# Altium PCB MainBoardPCB_PWR.PcbDoc (part 21 of 29)
Units mm, origin at the board's own origin, x right, y up, seen from the top; angles counter-clockwise.
Board outline 333.63 x 349.38 mm, 16 copper layers (L1, L2 (GND), L3 (Sign), L4 (GND), L5 (Sign), L6 (PWR/GND), L7(PWR/GND), L8 (PWR/GND), L9 (PWR/GND), L10 (PWR/GND), L11 (PWR/GND), L12 (Sign), L13 (GND), L14 (Sign), L15 (GND), L16), stack 2.503 mm thick; 2187 components, 1615 nets, 7987 pads, 1695 vias.
Unrouted connection lines stored in the file: 4757.
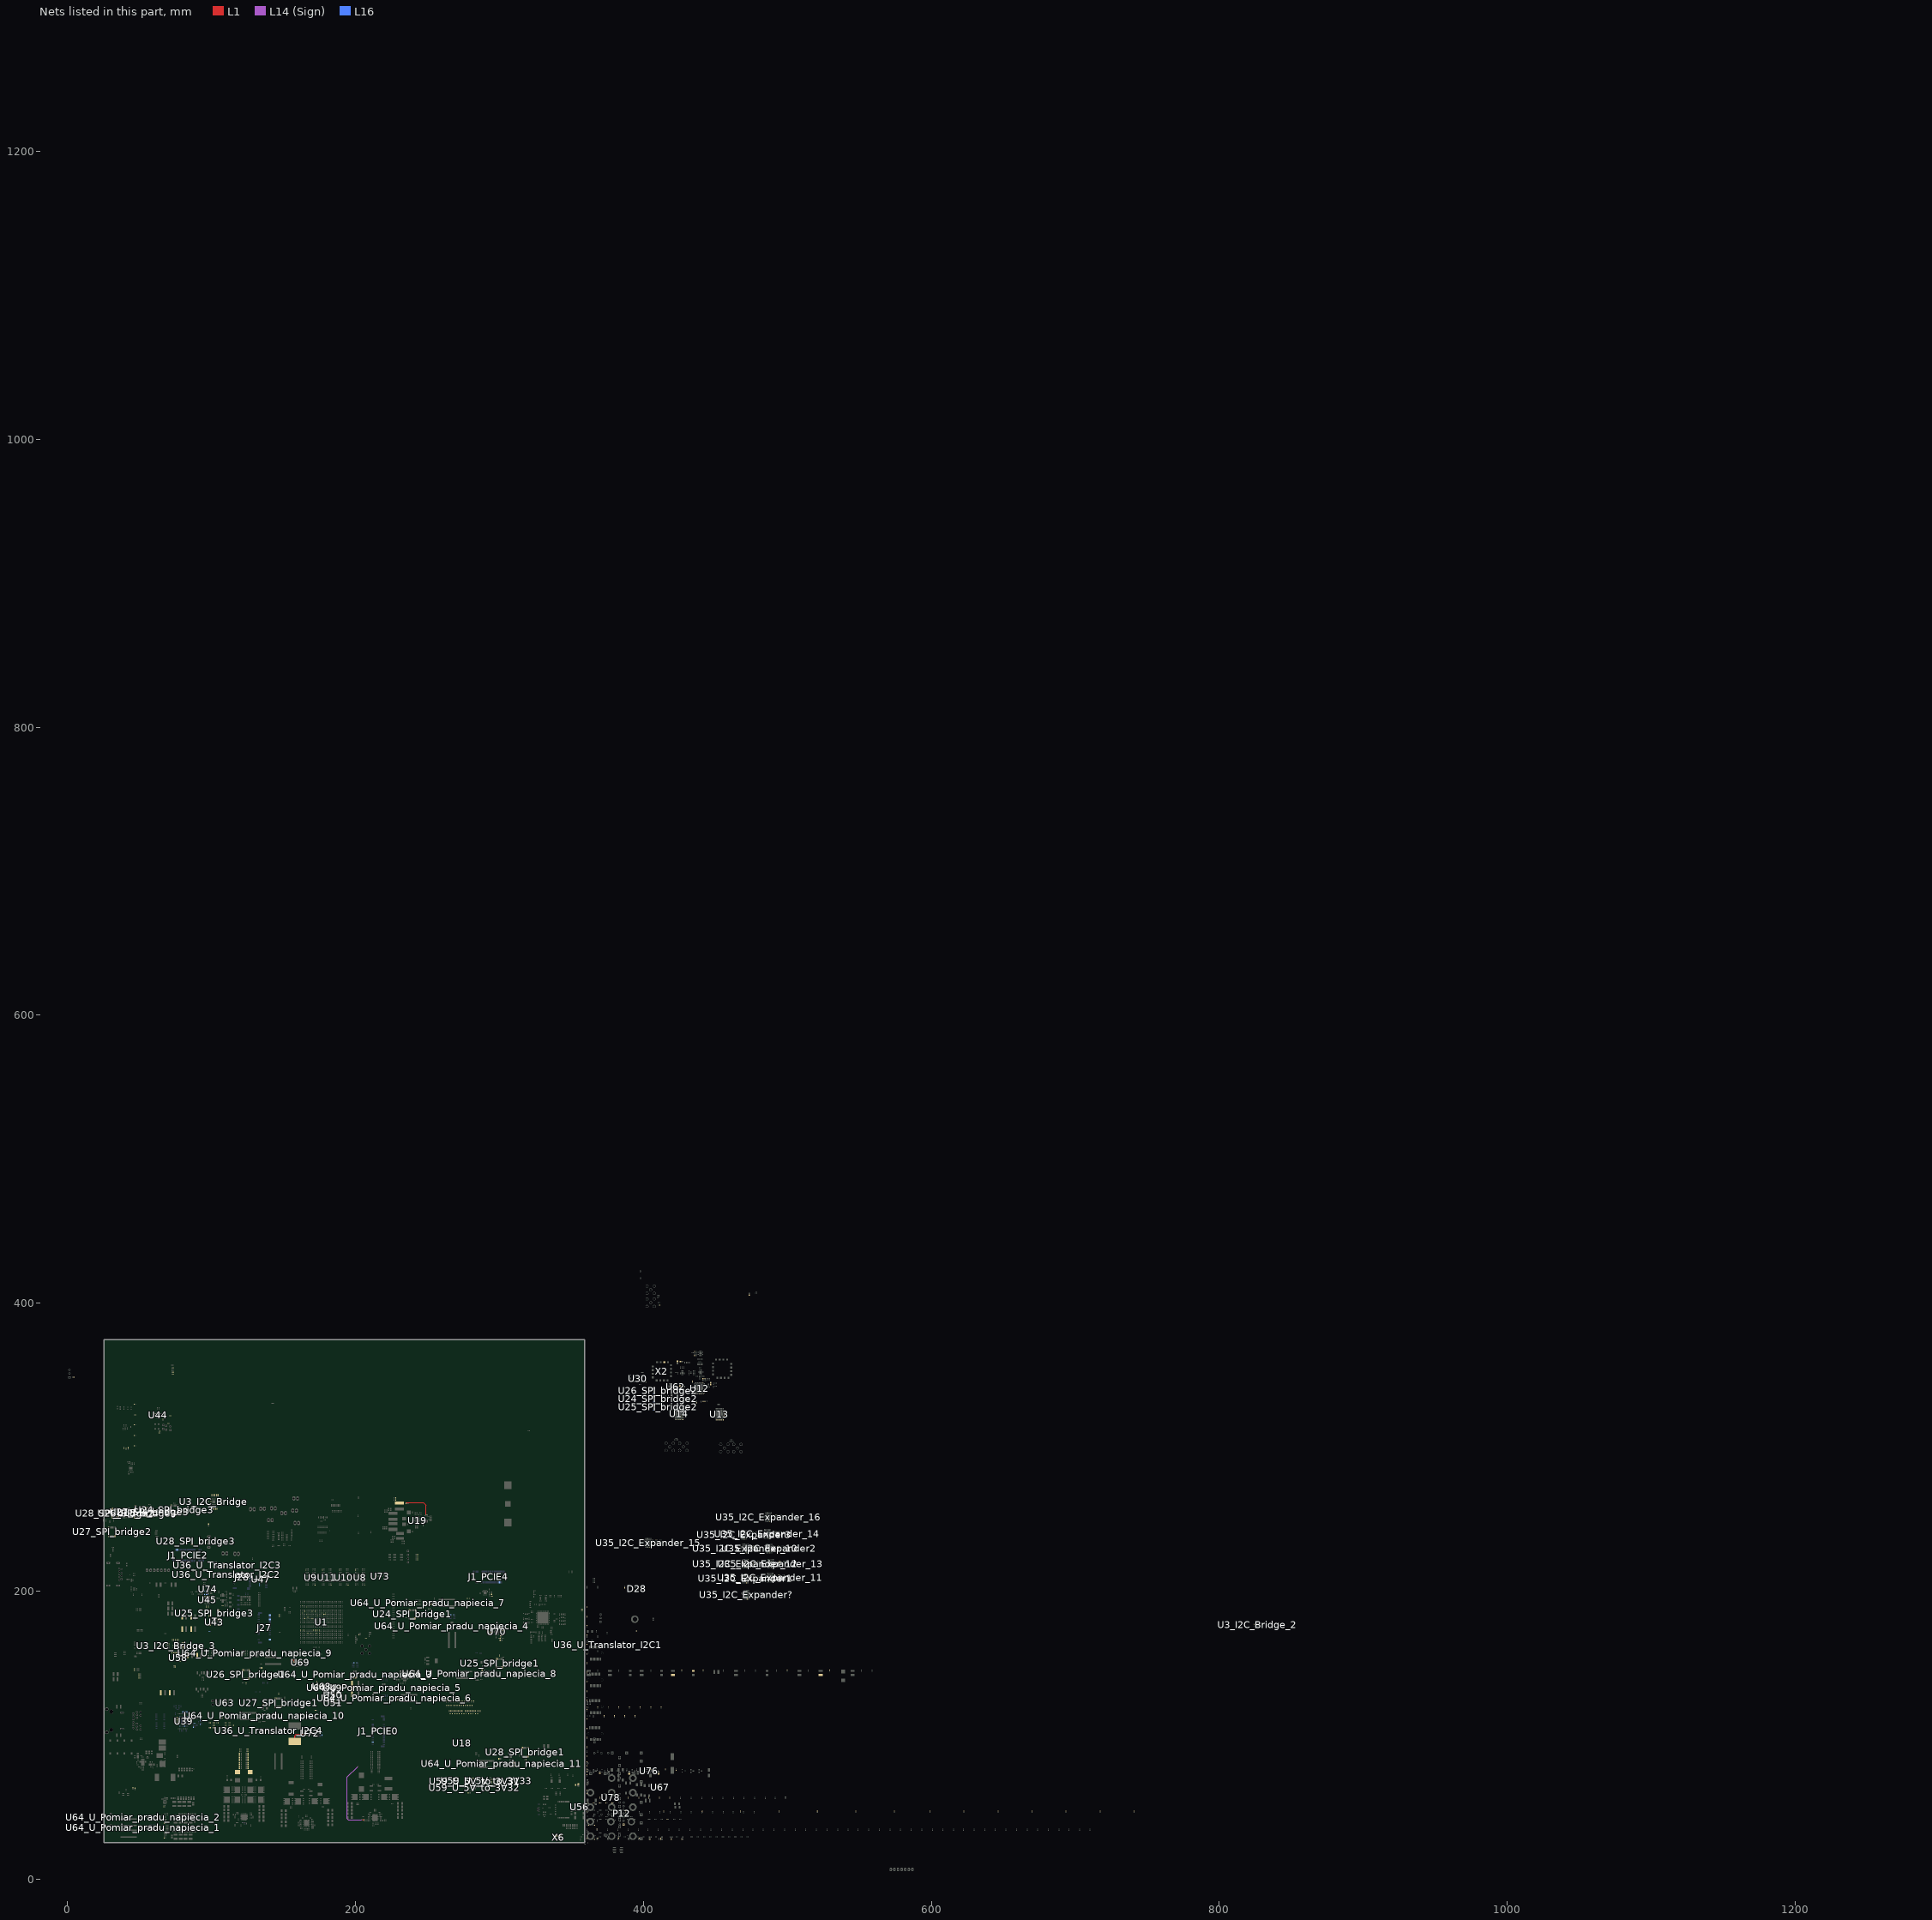
[diagram p16: the nets of this part, all layers, seen from the top]

## Part data (continued)
U74 U76: "IC GATE AND 1CH 2-INP SOT23-5", Case/Package=SOT-23, High Level Output Current=-32mA, Low Level Output Current=32mA, Manufacturer="Texas Instruments", Max Operating Temperature=125°C, Max Supply Voltage=5.5V, Min Operating Temperature=-40°C, Min Supply Voltage=1.65V, Package Quantity=1, Quiescent Current=10uA, Supplier Part Number 1=296-11601-1-ND, ComponentLink1Description=https://datasheet.ciiva.com/27049/756490-27049780.pdf?src-supplier=Jameco, ComponentLink1URL=https://datasheet.ciiva.com/27049/756490-27049780.pdf?src-supplier=Jameco, ComponentLink2Description=https://datasheet.ciiva.com/26048/sn74lvc1g08-26048421.pdf?src-supplier=Avnet+Europe, ComponentLink2URL=https://datasheet.ciiva.com/26048/sn74lvc1g08-26048421.pdf?src-supplier=Avnet+Europe, ComponentLink3Description=https://datasheet.ciiva.com/16503/sn74lvc1g08-16503398.pdf?src-supplier=Avnet+Asia, ComponentLink3URL=https://datasheet.ciiva.com/16503/sn74lvc1g08-16503398.pdf?src-supplier=Avnet+Asia, ComponentLink4Description=https://datasheet.ciiva.com/46439/1834190-46439158.pdf?src-supplier=Element14, ComponentLink4URL=https://datasheet.ciiva.com/46439/1834190-46439158.pdf?src-supplier=Element14, ComponentLink5Description=https://datasheet.ciiva.com/1864/sn74lvc1g08-1864152.pdf?src-supplier=Digi-Key, ComponentLink5URL=https://datasheet.ciiva.com/1864/sn74lvc1g08-1864152.pdf?src-supplier=Digi-Key, ComponentLink6Description=https://datasheet.ciiva.com/28540/1772545-28540795.pdf?src-supplier=Element14, ComponentLink6URL=https://datasheet.ciiva.com/28540/1772545-28540795.pdf?src-supplier=Element14, ComponentLink7Description=https://datasheet.ciiva.com/1864/sn74lvc1g08-1864153.pdf?src-supplier=Digi-Key, ComponentLink7URL=https://datasheet.ciiva.com/1864/sn74lvc1g08-1864153.pdf?src-supplier=Digi-Key, Contact Plating=Gold, Lead Free="Lead Free", Logic Function=AND, Manufacturer Part Number=SN74LVC1G08DBVR, Max Output Current=32mA, Mount="Surface Mount", Number of Bits=1, Number of Circuits=1, Number of Elements=1, Number of Gates=1, Number of Input Lines=2, Number of Inputs=2, Number of Output Lines=1, Number of Outputs=1, Number of Pins=5, Output Current=32mA, Packaging="Tape and Reel", Pricing 1="1 = 0,27000, 10 = 0,22100, 25 = 0,18560, 100 = 0,11740, 250 = 0,09064, 500 = 0,07726, 1000 = 0,05253 (USD)", Propagation Delay=4ns, Radiation Hardening=No, REACH SVHC="No SVHC", RoHS=Yes, Stock 1=64376, Supplier 1=Digi-Key, Termination=SMD/SMT, Turn-On Delay Time=4.5ns, Weight=0.000557oz
U75: "TVS DIODE 26.5VWM 44VC SOT323", Case/Package=SOT-323-3, Clamping Voltage=44V, Manufacturer=STMicroelectronics, Max Operating Temperature=175°C, Min Breakdown Voltage=28.5V, Min Operating Temperature=-55°C, Peak Pulse Current=3A, Peak Pulse Power=250W, Power Line Protection=No, Reverse Standoff Voltage=26.5V, Supplier Part Number 1=497-15845-1-ND, ComponentLink1Description=http://www.mouser.com/ds/2/389/esdcan02-2bwy-954689.pdf?src-supplier=Mouser, ComponentLink1URL=http://www.mouser.com/ds/2/389/esdcan02-2bwy-954689.pdf?src-supplier=Mouser, ComponentLink2Description=https://www.st.com/resource/en/datasheet/esdcan06-2bwy.pdf?src-supplier=Digi-Key, ComponentLink2URL=https://www.st.com/resource/en/datasheet/esdcan06-2bwy.pdf?src-supplier=Digi-Key, ComponentLink3Description=http://www.st.com/content/ccc/resource/sales_and_marketing/promotional_material/selection_guide/fa/8a/bd/fb/a8/06/42/00/sgdiodeauto.pdf/files/sgdiodeauto.pdf/jcr:content/translations/en.sgdiodeauto.pdf?src-supplier=Digi-Key, ComponentLink3URL=http://www.st.com/content/ccc/resource/sales_and_marketing/promotional_material/selection_guide/fa/8a/bd/fb/a8/06/42/00/sgdiodeauto.pdf/files/sgdiodeauto.pdf/jcr:content/translations/en.sgdiodeauto.pdf?src-supplier=Digi-Key, Composition=Zener, Manufacturer Part Number=ESDCAN02-2BWY, Mount="Surface Mount", Number of Bidirectional Channels=2, Packaging="Cut Tape", Pricing 1="1 = 0,43000, 10 = 0,32700, 25 = 0,29440, 100 = 0,15530, 250 = 0,15372, 500 = 0,13764, 1000 = 0,10712 (USD)", RoHS=Yes, Stock 1=3018, Supplier 1=Digi-Key
U77 U78: "Buffer/Driver 2-CH Non-Inverting Open Drain CMOS 6-Pin MicroPak T/R", Low Level Output Current=32mA, Manufacturer="ON Semiconductor / Fairchild", Max Operating Temperature=85°C, Max Supply Voltage=5.5V, Min Operating Temperature=-40°C, Min Supply Voltage=1.65V, Package Quantity=5000, Quiescent Current=1uA, Supplier Part Number 1=NC7WZ07FHXCT-ND, Category="Buffers, Drivers and Transceivers", ComponentLink1Description=http://components.arrow.com/part/dataview/50566895S8849776N7769?src-supplier=Arrow, ComponentLink1URL=http://components.arrow.com/part/dataview/50566895S8849776N7769?src-supplier=Arrow, ComponentLink2Description=http://www.mouser.com/ds/2/149/NC7WZ07-116137.pdf?src-supplier=Mouser, ComponentLink2URL=http://www.mouser.com/ds/2/149/NC7WZ07-116137.pdf?src-supplier=Mouser, ComponentLink3Description=http://uk.rs-online.com/webdocs/12cf/0900766b812cff2b.pdf?src-supplier=RSComponents, ComponentLink3URL=http://uk.rs-online.com/webdocs/12cf/0900766b812cff2b.pdf?src-supplier=RSComponents, ComponentLink4Description=http://components.arrow.com/part/dataview/0323_03242749?src-supplier=Arrow+Europe, ComponentLink4URL=http://components.arrow.com/part/dataview/0323_03242749?src-supplier=Arrow+Europe, ComponentLink5Description=http://www.produktinfo.conrad.com/datenblaetter/1200000-1299999/001253547-da-01-en-IC_BUFFER_UHS_DUA_NC7WZ07FHX_UFDFN_6_FSC.pdf?src-supplier=Conrad, ComponentLink5URL=http://www.produktinfo.conrad.com/datenblaetter/1200000-1299999/001253547-da-01-en-IC_BUFFER_UHS_DUA_NC7WZ07FHX_UFDFN_6_FSC.pdf?src-supplier=Conrad, ComponentLink6Description=https://www.fairchildsemi.com/datasheets/NC/NC7WZ07.pdf?src-supplier=Avnet, ComponentLink6URL=https://www.fairchildsemi.com/datasheets/NC/NC7WZ07.pdf?src-supplier=Avnet, ComponentLink7Description=http://www.fairchildsemi.com/datasheets/NC/NC7WZ07.pdf?src-supplier=Digi-Key, ComponentLink7URL=http://www.fairchildsemi.com/datasheets/NC/NC7WZ07.pdf?src-supplier=Digi-Key, ComponentLink8Description=https://www.fairchildsemi.com/datasheets/NC/NC7WZ07.pdf?src-supplier=Digi-Key, ComponentLink8URL=https://www.fairchildsemi.com/datasheets/NC/NC7WZ07.pdf?src-supplier=Digi-Key, ComponentLink9Description=https://www.onsemi.com/pub/Collateral/NC7WZ07-D.pdf?src-supplier=Digi-Key, ComponentLink9URL=https://www.onsemi.com/pub/Collateral/NC7WZ07-D.pdf?src-supplier=Digi-Key, Height=0.55mm, Length=1mm, Logic Function=Buffer,Inverting, Manufacturer Part Number=NC7WZ07FHX, Mount="Surface Mount", Number of Bits per Element=1, Number of Channels=2, Number of Elements=2, Number of Input Lines=2, Number of Inputs=2, Number of Output Lines=2, Number of Outputs=2, Number of Pins=6, Packaging="Tape and Reel", Polarity=Non-Inverting, Pricing 1="1=0,62000, 10=0,53300, 100=0,39800, 500=0,31270, 1000=0,24164 (USD)", Propagation Delay=12.6ns, RoHS=Yes, Schmitt Trigger Input=No, Stock 1=3074, Supplier 1=Digi-Key, Turn-On Delay Time=12.6ns, Weight=0.02g, Width=1mm
X1: library part CVCO55CC-2000-2000, Frequency=2GHz, Load Capacitance=22pF, Manufacturer=Crystek, Max Operating Temperature=85°C, Min Operating Temperature=-30°C, Operating Supply Voltage=8V, Package Quantity=1, Supplier Part Number 1=549-CVCO55CC20002000, ComponentLink1Description=https://datasheet.ciiva.com/12380/cvco55cc-2000-2000-218619-12380053.pdf?src-supplier=Mouser, ComponentLink1URL=https://datasheet.ciiva.com/12380/cvco55cc-2000-2000-218619-12380053.pdf?src-supplier=Mouser, ComponentLink2Description=https://datasheet.ciiva.com/6719/cvco55cc-2000-2000-6719815.pdf?src-supplier=Digi-Key, ComponentLink2URL=https://datasheet.ciiva.com/6719/cvco55cc-2000-2000-6719815.pdf?src-supplier=Digi-Key, Height=0.22inch, Length=0.5inch, Manufacturer Part Number=CVCO55CC-2000-2000, Packaging="Cut Tape", Pricing 1="1 = 32,65000, 5 = 31,16000, 10 = 28,20000, 25 = 26,71000, 50 = 25,23000, 100 = 22,26000 (USD)", RoHS=Yes, Stock 1=18, Supplier 1=Mouser, Termination=SMD/SMT, Width=0.5inch
X2: library part CVCO55CL-0490-0540, Case/Package=SMD/SMT, Frequency=540MHz, Load Capacitance=100pF, Manufacturer=Crystek, Max Operating Temperature=85°C, Max Supply Voltage=5.25V, Min Operating Temperature=-40°C, Min Supply Voltage=4.75V, Package Quantity=5, Supplier Part Number 1=744-1174-ND, ComponentLink1Description=https://datasheet.ciiva.com/884/cvco55cl-0490-0540-884171.pdf?src-supplier=Digi-Key, ComponentLink1URL=https://datasheet.ciiva.com/884/cvco55cl-0490-0540-884171.pdf?src-supplier=Digi-Key, ComponentLink2Description=https://datasheet.ciiva.com/12381/cvco55cl-0490-0540-32994-12381581.pdf?src-supplier=Mouser, ComponentLink2URL=https://datasheet.ciiva.com/12381/cvco55cl-0490-0540-32994-12381581.pdf?src-supplier=Mouser, ComponentLink3Description=https://datasheet.ciiva.com/14620/70051761-14620845.pdf?src-supplier=Allied+Electronics, ComponentLink3URL=https://datasheet.ciiva.com/14620/70051761-14620845.pdf?src-supplier=Allied+Electronics, Height=0.15inch, Length=0.5inch, Manufacturer Part Number=CVCO55CL-0490-0540, Mount="Surface Mount", Number of Pins=16, Packaging="Cut Tape", Pricing 1="1 = 24,31000, 5 = 23,20600, 10 = 20,99500, 25 = 19,89000, 50 = 18,78500 (USD)", RoHS=Yes, Stock 1=6, Supplier 1=Digi-Key, Termination=SMD/SMT, Width=0.5inch
X3: library part MP024S, "CRYSTAL 2.4576MHZ 32PF T/H", ESR (Equivalent Series Resistance)=300R, Frequency Stability=50ppm, Frequency Tolerance=30ppm, Load Capacitance=32pF, Manufacturer=CTS, Max Operating Temperature=70°C, Min Operating Temperature=-20°C, Package Quantity=100, Supplier Part Number 1=CTX069-ND, ComponentLink1Description=https://datasheet.ciiva.com/27056/2039161-27056418.pdf?src-supplier=Jameco, ComponentLink1URL=https://datasheet.ciiva.com/27056/2039161-27056418.pdf?src-supplier=Jameco, ComponentLink2Description=https://datasheet.ciiva.com/15116/getdatasheetpartid-123295-15116382.pdf?src-supplier=Verical, ComponentLink2URL=https://datasheet.ciiva.com/15116/getdatasheetpartid-123295-15116382.pdf?src-supplier=Verical, ComponentLink3Description=https://datasheet.ciiva.com/854/008-0308-0-854108.pdf?src-supplier=Digi-Key, ComponentLink3URL=https://datasheet.ciiva.com/854/008-0308-0-854108.pdf?src-supplier=Digi-Key, Depth=3.8mm, Frequency=2.4576MHz, Height=0.53inch, Lead Free="Lead Free", Length=10.85mm, Manufacturer Part Number=MP024S, Mount="Through Hole", Number of Pins=2, Packaging=Bulk, Pricing 1="1 = 1,14000, 10 = 1,08500, 50 = 1,05980, 100 = 0,90850, 500 = 0,88322, 1000 = 0,74443, 2500 = 0,70658, 5000 = 0,68135, 10000 = 0,65611 (USD)", Radiation Hardening=No, RoHS=Yes, Series Resistance=300R, Stock 1=2166, Supplier 1=Digi-Key, Termination=Radial, Tolerance=30ppm, Width=0.15inch
X4: "CRYSTAL 25.0000MHZ 18PF SMD", Case/Package=SMD/SMT, ESR (Equivalent Series Resistance)=50R, Frequency=25MHz, Frequency Stability=30ppm, Frequency Tolerance=50ppm, Load Capacitance=18pF, Manufacturer 1=Epson, Max Operating Temperature=70°C, Min Operating Temperature=-20°C, Package Quantity=250, Supplier Part Number 1=SER3691CT-ND, ComponentLink1Description=http://www.mouser.com/ds/2/137/A-238_en-932914.pdf?src-supplier=Mouser, ComponentLink1URL=http://www.mouser.com/ds/2/137/A-238_en-932914.pdf?src-supplier=Mouser, ComponentLink2Description=https://www5.epsondevice.com/en/information/support/pdf/june_2018_psc_masterbook.pdf?src-supplier=Digi-Key, ComponentLink2URL=https://www5.epsondevice.com/en/information/support/pdf/june_2018_psc_masterbook.pdf?src-supplier=Digi-Key, Height=0.028inch, Lead Free="Lead Free", Length=0.126inch, Manufacturer Part Number 1=FA-23825.0000MB-C3, Mount="Surface Mount", Packaging="Tape and Reel", Pricing 1="1=0,36000, 10=0,30300, 50=0,27220, 100=0,24200 (USD)", RoHS=Yes, Stock 1=39779, Supplier 1=Digi-Key, Termination=SMD/SMT, Tolerance=50ppm, Weight=0.000564oz, Width=0.098inch
X5: library part FC-13532.7680KA-A5, "CRYSTAL 32.7680 KHZ 12.5PF SMD", Case/Package=SMD/SMT, ESR (Equivalent Series Resistance)=70kR, Frequency Tolerance=20ppm, Load Capacitance=12.5pF, Manufacturer=Epson, Max Operating Temperature=85°C, Min Operating Temperature=-40°C, Supplier Part Number 1=SER4103CT-ND, Category=Crystals, ComponentLink1Description=https://support.epson.biz/td/api/doc_check.php?dl=brief_FC-135&lang=en&src-supplier=Digi-Key, ComponentLink1URL=https://support.epson.biz/td/api/doc_check.php?dl=brief_FC-135&lang=en&src-supplier=Digi-Key, ComponentLink2Description=https://www.eea.epson.com/wp-content/uploads/2016/11/November-2016-PCS-MASTER-BOOK.pdf?src-supplier=Digi-Key, ComponentLink2URL=https://www.eea.epson.com/wp-content/uploads/2016/11/November-2016-PCS-MASTER-BOOK.pdf?src-supplier=Digi-Key, Frequency=32.768kHz, Height=0.035inch, Length=0.126inch, Manufacturer Part Number=FC-13532.7680KA-A5, Mount="Surface Mount", Number of Pins=2, Packaging="Tape and Reel", Pricing 1="1=0,43000, 10=0,35800, 50=0,32180, 100=0,28600, 500=0,27170, 1000=0,22880 (USD)", RoHS=Yes, Series Resistance=70kR, Stock 1=101729, Supplier 1=Digi-Key, Width=0.061inch
X6: "SMD Crystal Oscillator 50MHz 3.3V 4-Pin SMD Tray", Case/Package=SMD/SMT, Frequency=50MHz, Frequency Stability=20ppm, Manufacturer="Silicon Labs", Operating Supply Voltage=3.3V, Package Quantity=1, Supplier Part Number 1=336-5245-ND, ComponentLink1Description=https://datasheet.ciiva.com/9292/+si510-11-9292588.pdf?src-supplier=Avnet, ComponentLink1URL=https://datasheet.ciiva.com/9292/+si510-11-9292588.pdf?src-supplier=Avnet, Length=5mm, Manufacturer Part Number=510CCA50M0000BAG, Packaging=Tray, Pricing 1="1 = 3,26000, 25 = 3,13800, 100 = 3,01710, 1000 = 2,62163 (USD)", RoHS=Yes, Stock 1=247, Supplier 1=Digi-Key, Weight=0.001764oz, Width=3.2mm
X7: "CRYSTAL 24.00 MHZ 9.0PF SMD", Case/Package=SMD/SMT, ESR (Equivalent Series Resistance)=40R, Frequency=24MHz, Frequency Stability=15ppm, Frequency Tolerance=10ppm, Load Capacitance=9pF, Manufacturer 1=Epson, Max Operating Temperature=85°C, Min Operating Temperature=-40°C, Supplier Part Number 1=SER4180DKR-ND, ComponentLink1Description=https://www5.epsondevice.com/en/information/support/pdf/june_2018_psc_masterbook.pdf?src-supplier=Digi-Key, ComponentLink1URL=https://www5.epsondevice.com/en/information/support/pdf/june_2018_psc_masterbook.pdf?src-supplier=Digi-Key, Height=0.024inch, Lead Free="Lead Free", Length=0.126inch, Manufacturer Part Number 1=TSX-322524.0000MF15X-AC6, Mount="Surface Mount", Packaging="Tape and Reel", Pricing 1="1=0,36000, 10=0,30300, 50=0,27220, 100=0,24200, 500=0,22990, 1000=0,19360 (USD)", RoHS=Yes, Stock 1=33708, Supplier 1=Digi-Key, Width=0.098inch
X8: Manufacturer 1="ECS International", Supplier Part Number 1=XC2904CT-ND, Manufacturer Part Number 1=ECS-120-8-33-RWY-TR, Pricing 1="1=0,56000, 10=0,46500, 50=0,41820, 100=0,37180, 500=0,35322 (USD)", RoHS=No, Stock 1=526, Supplier 1=Digi-Key
X9: "OSC MEMS 48.0000MHZ LVCMOS SMD", Case/Package=SMD/SMT, Frequency=48MHz, Frequency Stability=25ppm, Manufacturer=SiTime, Max Operating Temperature=85°C, Max Supply Current=4.5mA, Min Operating Temperature=-40°C, Supplier Part Number 1=1473-30890-1-ND, Category=Oscillators, ComponentLink1Description=https://www.sitime.com/products/datasheets/sit1602/SiT1602B-datasheet.pdf?src-supplier=Digi-Key, ComponentLink1URL=https://www.sitime.com/products/datasheets/sit1602/SiT1602B-datasheet.pdf?src-supplier=Digi-Key, Height=0.032inch, Length=0.098inch, Manufacturer Part Number=SIT1602BI-12-33E-48.000000G, Mount="Surface Mount", Packaging="Tape and Reel", Pricing 1="1=1,36000, 10=1,30100, 50=1,27060, 100=1,08900 (USD)", RoHS=Yes, Stock 1=283, Supplier 1=Digi-Key, Width=0.079inch
P7 P8 P9 P10: LatestRevisionDate=17-Jul-2002, LatestRevisionNote="Re-released for DXP Platform.", Publisher="Altium Limited"

## Via types
v1: diameter 0.5, hole 0.2, L1 to L16, 786 vias
v2: diameter 0.5/0.35/0.35/0.35/0.35/0.35/0.35/0.35/0.35/0.35/0.35/0.35/0.35/0.35/0.35/0.5 (per signal layer), hole 0.15, L1 to L16, tented both sides, 164 vias
v3: diameter 2.54, hole 1.02, L1 to L16, 152 vias
v4: diameter 0.5/0.35/0.35/0.35/0.35/0.35/0.35/0.35/0.35/0.35/0.35/0.35/0.35/0.35/0.35/0.5 (per signal layer), hole 0.2, L1 to L16, tented both sides, 100 vias
v5: diameter 0.45, hole 0.15, L1 to L16, 79 vias
v6: diameter 0.35/0/0.35 (per signal layer), hole 0.127, L1 to L3 (Sign), tented both sides, 78 vias
v7: diameter 0.45/0.45/0.45/0.45/0.45/0.45/0.45/0.45/0.45/0.45/0.45/0.45/0.45/0.45/0.45/0.45 (per signal layer), hole 0.15, L1 to L16, 65 vias
v8: diameter 0.4, hole 0.15, L1 to L16, 61 vias
v9: diameter 0.2, hole 0.1, L1 to L16, 35 vias
v10: diameter 0.5, hole 0.2, L1 to L16, tented both sides, 32 vias
v11: diameter 0.2/0/0.2 (per signal layer), hole 0.1, L1 to L3 (Sign), 28 vias
v12: diameter 0.4, hole 0.2, L1 to L16, 16 vias
v13: diameter 0.25, hole 0.2, L1 to L16, 16 vias
v14: diameter 0.3, hole 0.2, L1 to L16, 15 vias
v15: diameter 0.5/0.35/0.35/0.35/0.35/0.35/0.35/0.35/0.35/0.35/0.35/0.35/0.35/0.35/0.35/0.45 (per signal layer), hole 0.15, L1 to L16, tented both sides, 10 vias
v16: diameter 5, hole 3, L1 to L16, 9 vias
v17: diameter 0.2/0/0.2 (per signal layer), hole 0.1, L1 to L3 (Sign), tented both sides, 9 vias
v18: diameter 0.35/0/0.35 (per signal layer), hole 0.127, L1 to L3 (Sign), 7 vias
v19: diameter 0.35/0/0.35 (per signal layer), hole 0.127, L14 (Sign) to L16, tented both sides, 5 vias
v20: diameter 1.65, hole 1.65, L1 to L16, 4 vias
v21: diameter 1.15, hole 1.15, L1 to L16, 4 vias
v22: diameter 0.35, hole 0.127, L1 to L2 (GND), 2 vias
v23: diameter 0.4, hole 0.2, L1 to L16, tented both sides, 2 vias
v24: diameter 0.35, hole 0.127, L1 to L2 (GND), tented both sides, 2 vias
v25: diameter 0.508, hole 0.127, L1 to L2 (GND), 2 vias
v26: diameter 0.508, hole 0.127, L2 (GND) to L3 (Sign), 2 vias
v27: diameter 0.35, hole 0.127, L3 (Sign) to L6 (PWR/GND), tented both sides, 2 vias
v28: diameter 0.5, hole 0.2, L3 (Sign) to L6 (PWR/GND), tented both sides, 2 vias
v29: diameter 5.5, hole 3.5, L1 to L16, 1 vias
v30: diameter 0.45/0.45/0.45 (per signal layer), hole 0.15, L1 to L3 (Sign), 1 vias
v31: diameter 0.35/0.35/0.35 (per signal layer), hole 0.127, L1 to L3 (Sign), tented both sides, 1 vias
v32: diameter 0.45/0/0.45 (per signal layer), hole 0.15, L1 to L3 (Sign), tented both sides, 1 vias
v33: diameter 0.45/0/0.45 (per signal layer), hole 0.2, L14 (Sign) to L16, tented both sides, 1 vias
v34: diameter 0.35, hole 0.127, L2 (GND) to L3 (Sign), 1 vias

## Nets (pads, with @x,y where several pads share a name; then routed paths per layer and width w, separated by ;. In a path a pad name is that pad's centre, name@x,y a point inside that pad or via, vN(x,y) a via of type N, cw(c..) or ccw(c..) an arc to the next point about the centre after c; other vN are vias at no path point)
0.85V@40A_INA: C359.2 C360.2 C361.2 C362.2 C363.2 C364.2 C365.2 C366.2 C367.2 C368.2 C369.2 C370.2 C377.2 C378.2 C379.2 C380.2 C381.2 C382.2 C383.2 C384.2 C385.2 C386.2 C387.2 C388.2 L9.2 L10.2 R617.1 U72.10 | length 10.4
  L1 w0.164: 161.582,100.408 161.902,100.728 163.858,100.728
  L1 w0.912: R617.1@157.952,95.58 157.952,99.541 158.819,100.408 161.582,100.408
0V9@1A_REG3: C709.2 C710.2 R673.2 U1.A10 U1.C10 U1.F8 U1.H8 U1.M8 U1.P8 U70.11 U70.12
0V85@2A: C675.2 C746.2 FB45.2 U1.J23 U1.L23 | length 2.3
  L1 w0.254: 156.588,152.162 156.608,152.142 157.567,152.142 C675.2@157.587,152.122 FB45.2@157.587,150.837
1V0@1.5A: C505.2 C506.2 C507.2 C508.2 C509.2 C510.2 C511.2 C512.2 C513.2 C514.2 C555.2 R397.2 U39.6 U39.24 U39.31 U39.42 U51.8
1V8@0.5A_ADC_filtered: C705.2 C706.2 C749.2 C750.2 C757.1 C758.2 D28.3 FB38.1 FB40.1 FB42.1 R671.2 R694.1 R745.2 U1.K10 U1.L10 U1.M10 U1.N10 U1.P10 U1.T22 U1.U21 U1.V21 U1.V22 U70.14 U70.15
1V8@1.5A: C485.2 C486.2 C487.2 C488.2 C489.2 C490.2 C553.2 C561.2 C729.2 C730.2 R394.2 U39.13 U39.48 U45.28 U45.30 U50.8 U58.8
2V5@1.5A: C499.2 C500.2 C501.2 C502.2 C503.2 C504.2 C551.2 C782.2 C783.2 C784.2 C785.2 C786.2 C787.2 C788.2 C789.2 R391.2 R392.2 U8.B1 U8.R6 U9.B1 U9.R6 U10.B1 U10.R6 U11.B1 U11.R6 U39.3 U39.9 U49.8
3.3V_LN_1: C55.2 C56.2 C59.2 C60.2 C65.2 C66.2 C71.2 C72.2 C84.2 C85.2 C94.2 C95.2 C569.2 FB2.1 FB3.1 FB4.1 FB5.1 FB6.1 FB7.1 FB33.2 | length 0.1
  L1 w0.254: C569.2@294.834,196.4 C569.2@294.875,196.36
3.3V_PS_Config: C491.2 C492.2 C493.2 C494.2 C495.2 C496.2 C497.2 C498.2 C531.1 C547.2 C612.2 C613.2 C614.2 C615.2 C742.1 C743.2 C790.2 L17.2 R83.2 R84.2 R85.2 R86.2 R97.2 R98.2 R99.2 R106.1 R123.2 R216.1 R319.2 R320.2 R322.2 R323.2 R333.1 R336.1 R337.1 R338.1 R346.1 R347.1 R348.1 R349.2 R350.2 R351.2 R352.2 R353.1 R354.2 R355.1 R356.1 R357.2 R367.2 R368.2 R369.2 R370.2 R371.2 R372.2 R381.2 R382.2 R709.1 R710.2 R715.2 R716.2 R717.2 R718.2 R719.2 R737.2 U1.B22 U1.B27 U1.D18 U1.D23 U1.D28 U1.E21 U1.E26 U1.F19 U1.J18 U1.N20 U1.P18 U39.19 U39.30 U39.41 U43.1 U43.2 U43.7 U43.8 U43.15 U43.16 U44.1 U47.B3 U47.C4 U56.15 U68.3 U76.5 X6.1 X6.4 | length 21.9
  L1 w0.254: C614.2@235.147,260.761 235.42,261.034 235.42,261.439 235.57,261.588 247.122,261.588 249.13,259.58 R216.1@249.13,253.074
3.3V_Stable_1: C149.2 C150.2 C151.2 C152.2 C153.2 C154.2 C155.2 C156.2 C157.2 C158.2 C159.2 C160.2 C161.2 C181.2 C182.2 C183.2 C184.2 C185.2 C186.2 C187.2 C188.2 C189.2 C190.2 C191.2 C192.2 C193.2 C565_U_5V_to_3V33.2 C566_U_5V_to_3V33.2 C567_U_5V_to_3V33.2 R430_U_5V_to_3V33.2 R431_U_5V_to_3V33.2 U12.2 U12.5 U12.8 U12.11 U12.14 U12.17 U12.20 U12.23 U12.26 U12.29 U12.32 U12.35 U59_U_5V_to_3V33.8
3.3V_Stable_2: C166.2 C167.2 C168.2 C169.2 C170.2 C171.2 C172.2 C173.2 C174.2 C175.2 C176.2 C177.2 C178.2 C194.2 C195.2 C196.2 C197.2 C198.2 C199.2 C200.2 C201.2 C202.2 C203.2 C204.2 C205.2 C206.2 C565_U_5V_to_3V32.2 C566_U_5V_to_3V32.2 C567_U_5V_to_3V32.2 R430_U_5V_to_3V32.2 R431_U_5V_to_3V32.2 U13.2 U13.5 U13.8 U13.11 U13.14 U13.17 U13.20 U13.23 U13.26 U13.29 U13.32 U13.35 U59_U_5V_to_3V32.8
3.3V_Stable_3: C111.2 C112.2 C113.2 C114.2 C115.2 C116.2 C117.2 C118.2 C119.2 C120.2 C121.2 C122.2 C123.2 C128.2 C129.2 C130.2 C131.2 C132.2 C133.2 C134.2 C135.2 C136.2 C137.2 C138.2 C139.2 C140.2 C565_U_5V_to_3V31.2 C566_U_5V_to_3V31.2 C567_U_5V_to_3V31.2 R430_U_5V_to_3V31.2 R431_U_5V_to_3V31.2 U14.2 U14.5 U14.8 U14.11 U14.14 U14.17 U14.20 U14.23 U14.26 U14.29 U14.32 U14.35 U59_U_5V_to_3V31.8
3.3Vaux: C332.2 J27.2 J27.4 J27.12 J27.14 J27.16 J27.18 J27.62 J27.64 J27.66 U18.C2 U18.D1 U18.D2 U18.E1 U18.E2 U18.F1 U18.F2
3V3_Rail: C303_I2C_Bridge.2 C303_I2C_Bridge_2.2 C303_I2C_Bridge_3.2 C309_U_Pomiar_pradu_napiecia_1.2 C309_U_Pomiar_pradu_napiecia_2.2 C309_U_Pomiar_pradu_napiecia_3.2 C309_U_Pomiar_pradu_napiecia_4.2 C309_U_Pomiar_pradu_napiecia_5.2 C309_U_Pomiar_pradu_napiecia_6.2 C309_U_Pomiar_pradu_napiecia_7.2 C309_U_Pomiar_pradu_napiecia_8.2 C309_U_Pomiar_pradu_napiecia_9.2 C309_U_Pomiar_pradu_napiecia_10.2 C309_U_Pomiar_pradu_napiecia_11.2 C310.2 C311_I2C_Expander1.2 C311_I2C_Expander2.2 C311_I2C_Expander3.2 C311_I2C_Expander?.2 C311_I2C_Expander_10.2 C311_I2C_Expander_11.2 C311_I2C_Expander_12.2 C311_I2C_Expander_13.2 C311_I2C_Expander_14.2 C311_I2C_Expander_15.2 C311_I2C_Expander_16.2 C324.2 C331.2 C339.2 C545.2 C546.2 C550.2 C552.2 C554.2 C562.2 C585.2 C623.2 C654.2 C676.2 C707.2 C708.2 C721.2 C732.2 C735.2 C792.2 FB1_PCIE0.2 FB1_PCIE1.2 FB1_PCIE2.2 FB1_PCIE3.2 FB1_PCIE4.2 FB23.1 FB24.1 J1_PCIE0.6 J1_PCIE0.8 J1_PCIE0.10 J1_PCIE2.6 J1_PCIE2.8 J1_PCIE2.10 J1_PCIE4.6 J1_PCIE4.8 J1_PCIE4.10 J28.4 L1.1 L2.1 L3.1 L4.1 L5.1 L6.1 L7.1 L8.1 P12.1 R3_I2C_Bridge.2 R3_I2C_Bridge_2.2 R3_I2C_Bridge_3.2 R4_I2C_Bridge.2 R4_I2C_Bridge_2.2 R4_I2C_Bridge_3.2 R5_I2C_Bridge.2 R5_I2C_Bridge_2.2 R5_I2C_Bridge_3.2 R6_I2C_Bridge.2 R6_I2C_Bridge_2.2 R6_I2C_Bridge_3.2 R7_I2C_Bridge.2 R7_I2C_Bridge_2.2 R7_I2C_Bridge_3.2 R8_I2C_Bridge.2 R8_I2C_Bridge_2.2 R8_I2C_Bridge_3.2 R9_I2C_Bridge.2 R9_I2C_Bridge_2.2 R9_I2C_Bridge_3.2 R10_I2C_Bridge.2 R10_I2C_Bridge_2.2 R10_I2C_Bridge_3.2 R11.1 R13.1 R16.1 R29.2 R30.2 R65.2 R66.2 R67.2 R68.2 R71.2 R72.2 R124.2 R175.1 R179.1 R184.1 R188.1 R193.1 R197.1 R202.1 R206.1 R211.1 R219.1 R223_I2C_Bridge.2 R223_I2C_Bridge_2.2 R223_I2C_Bridge_3.2 R224_I2C_Bridge.2 R224_I2C_Bridge_2.2 R224_I2C_Bridge_3.2 R225_I2C_Bridge.2 R225_I2C_Bridge_2.2 R225_I2C_Bridge_3.2 R226_I2C_Bridge.2 R226_I2C_Bridge_2.2 R226_I2C_Bridge_3.2 R227_I2C_Bridge.2 R227_I2C_Bridge_2.2 R227_I2C_Bridge_3.2 R230.1 R231_SPI_bridge1.2 R231_SPI_bridge2.2 R233_SPI_bridge1.2 R233_SPI_bridge2.2 R233_SPI_bridge3.2 R236_SPI_bridge1.2 R236_SPI_bridge2.2 R236_SPI_bridge3.2 R238_SPI_bridge1.2 R240_SPI_bridge1.2 R240_SPI_bridge2.2 R241.2 R243.2 R252.2 R253.2 R281.2 R287.2 R376.2 R377.2 R378.2 R388.1 R425.2 R426.2 R427.2 R428.2 R429.2 R448_U_Pomiar_pradu_napiecia_3.2 R449.2 R451.2 R453.2 R455.2 R458.2 R462.2 R463.1 R468.1 R469.2 R471.2 R473.2 R475.2 R477.2 R479.2 R492.2 R494.2 R496.2 R500.2 R502.2 R504.2 R508.2 R510.2 R512.2 R516.2 R518.2 R520.2 R524.2 R526.2 R528.2 R538.2 R558_I2C_Bridge.2 R558_I2C_Bridge_2.2 R558_I2C_Bridge_3.2 R559_I2C_Bridge.2 R559_I2C_Bridge_2.2 R559_I2C_Bridge_3.2 R560_I2C_Bridge.2 R560_I2C_Bridge_2.2 R560_I2C_Bridge_3.2 R562.1 R566.1 R570.1 R574.1 R578.1 R582.1 R586.1 R590.1 R596.1 R599.2 R600.2 R602.1 R603.1 R604.1 R605.1 R606.1 R630.1 R632.2 R633.2 R634.2 R646.1 R649.1 R676.2 R691.1 R697.2 R699.2 R701.2 R703.2 R705.2 R707.2 R730.2 R731.2 R732.2 R733.2 R734.2 R738.2 R740.2 R742.2 R746.2 R747.2 R748.2 R749.2 R750.2 R751.2 R752.2 R753.2 R754.2 R755.2 R756.2 R757.2 R758.2 R760.2 R762.2 R832.1 R833.1 R834.1 R835.1 U3_I2C_Bridge.21 U3_I2C_Bridge_2.21 U3_I2C_Bridge_3.21 U15.15 U18.C3 U18.D3 U18.D4 U18.E3 U18.E4 U18.F3 U18.F4 U19.13 U19.16 U24_SPI_bridge1.1 U24_SPI_bridge1.7 U24_SPI_bridge1.8 U24_SPI_bridge1.15 U24_SPI_bridge1.16 U24_SPI_bridge2.1 U24_SPI_bridge2.7 U24_SPI_bridge2.8 U24_SPI_bridge2.15 U24_SPI_bridge2.16 U24_SPI_bridge3.1 U24_SPI_bridge3.7 U24_SPI_bridge3.8 U24_SPI_bridge3.16 U25_SPI_bridge1.1 U25_SPI_bridge1.7 U25_SPI_bridge1.8 U25_SPI_bridge1.15 U25_SPI_bridge1.16 U25_SPI_bridge2.1 U25_SPI_bridge2.7 U25_SPI_bridge2.8 U25_SPI_bridge2.15 U25_SPI_bridge2.16 U25_SPI_bridge3.1 U25_SPI_bridge3.7 U25_SPI_bridge3.8 U25_SPI_bridge3.15 U25_SPI_bridge3.16 U26_SPI_bridge1.1 U26_SPI_bridge1.7 U26_SPI_bridge1.8 U26_SPI_bridge1.15 U26_SPI_bridge1.16 U26_SPI_bridge2.1 U26_SPI_bridge2.7 U26_SPI_bridge2.8 U26_SPI_bridge2.15 U26_SPI_bridge2.16 U26_SPI_bridge3.1 U26_SPI_bridge3.7 U26_SPI_bridge3.8 U26_SPI_bridge3.15 U26_SPI_bridge3.16 U27_SPI_bridge1.1 U27_SPI_bridge1.7 U27_SPI_bridge1.8 U27_SPI_bridge1.15 U27_SPI_bridge1.16 U27_SPI_bridge2.1 U27_SPI_bridge2.7 U27_SPI_bridge2.8 U27_SPI_bridge2.16 U27_SPI_bridge3.1 U27_SPI_bridge3.7 U27_SPI_bridge3.8 U27_SPI_bridge3.16 U28_SPI_bridge1.1 U28_SPI_bridge1.7 U28_SPI_bridge1.8 U28_SPI_bridge1.15 U28_SPI_bridge1.16 U28_SPI_bridge2.1 U28_SPI_bridge2.7 U28_SPI_bridge2.8 U28_SPI_bridge2.15 U28_SPI_bridge2.16 U28_SPI_bridge3.1 U28_SPI_bridge3.7 U28_SPI_bridge3.8 U28_SPI_bridge3.16 U35_I2C_Expander1.5 U35_I2C_Expander2.5 U35_I2C_Expander3.5 U35_I2C_Expander?.5 U35_I2C_Expander_10.5 U35_I2C_Expander_11.5 U35_I2C_Expander_12.5 U35_I2C_Expander_13.5 U35_I2C_Expander_14.5 U35_I2C_Expander_15.5 U35_I2C_Expander_16.5 U36_U_Translator_I2C1.7 U36_U_Translator_I2C2.2 U36_U_Translator_I2C2.7 U36_U_Translator_I2C3.2 U36_U_Translator_I2C3.7 U36_U_Translator_I2C4.7 U45.32 U47.A4 U49.1 U49.2 U50.1 U50.2 U51.1 U51.2 U58.5 U63.3 U64_U_Pomiar_pradu_napiecia_1.6 U64_U_Pomiar_pradu_napiecia_2.6 U64_U_Pomiar_pradu_napiecia_3.6 U64_U_Pomiar_pradu_napiecia_3.8 U64_U_Pomiar_pradu_napiecia_3.9 U64_U_Pomiar_pradu_napiecia_4.6 U64_U_Pomiar_pradu_napiecia_5.6 U64_U_Pomiar_pradu_napiecia_6.6 U64_U_Pomiar_pradu_napiecia_7.6 U64_U_Pomiar_pradu_napiecia_8.6 U64_U_Pomiar_pradu_napiecia_9.6 U64_U_Pomiar_pradu_napiecia_10.6 U64_U_Pomiar_pradu_napiecia_11.6 U67.1 U68.1 U69.1 U69.2 U69.3 U69.15 U69.16 U70.1 U70.2 U70.4 U70.5 U72.6 U73.2 U74.5 U78.5 | length 53
  L1 w0.254: C554.2@181.782,123.677 C554.2@181.787,123.677 ; v9(204.604,41.265) 205.788,41.265 R287.2@205.838,41.314 ; U64_U_Pomiar_pradu_napiecia_4.6@266.005,173.619 U64_U_Pomiar_pradu_napiecia_4.6@266.014,173.609
  L14 (Sign) w0.254: 194.963,41.245 194.332,41.875 194.332,70.801 v9(201.672,78.14) ; 194.982,41.265 v9(204.604,41.265)
  L16 w0.254: R578.1@219.302,141.279 R582.1@221.208,141.279
  other v4: 220.243,141.279
5V_LN: C580.2 R443.2 R608.2 U12.42 U30.1 U30.5 U62.9 U62.10 X2.14